# Altium PCB main_ADC_PCB.PcbDoc (part 2 of 8)
Units mm, origin at the board's own origin, x right, y up, seen from the top; angles counter-clockwise.
Board outline 150 x 100 mm, 4 copper layers (Top Layer, Layer 1, Layer 2, Bottom Layer), stack 1.62 mm thick; 535 components, 354 nets, 1725 pads, 1075 vias.
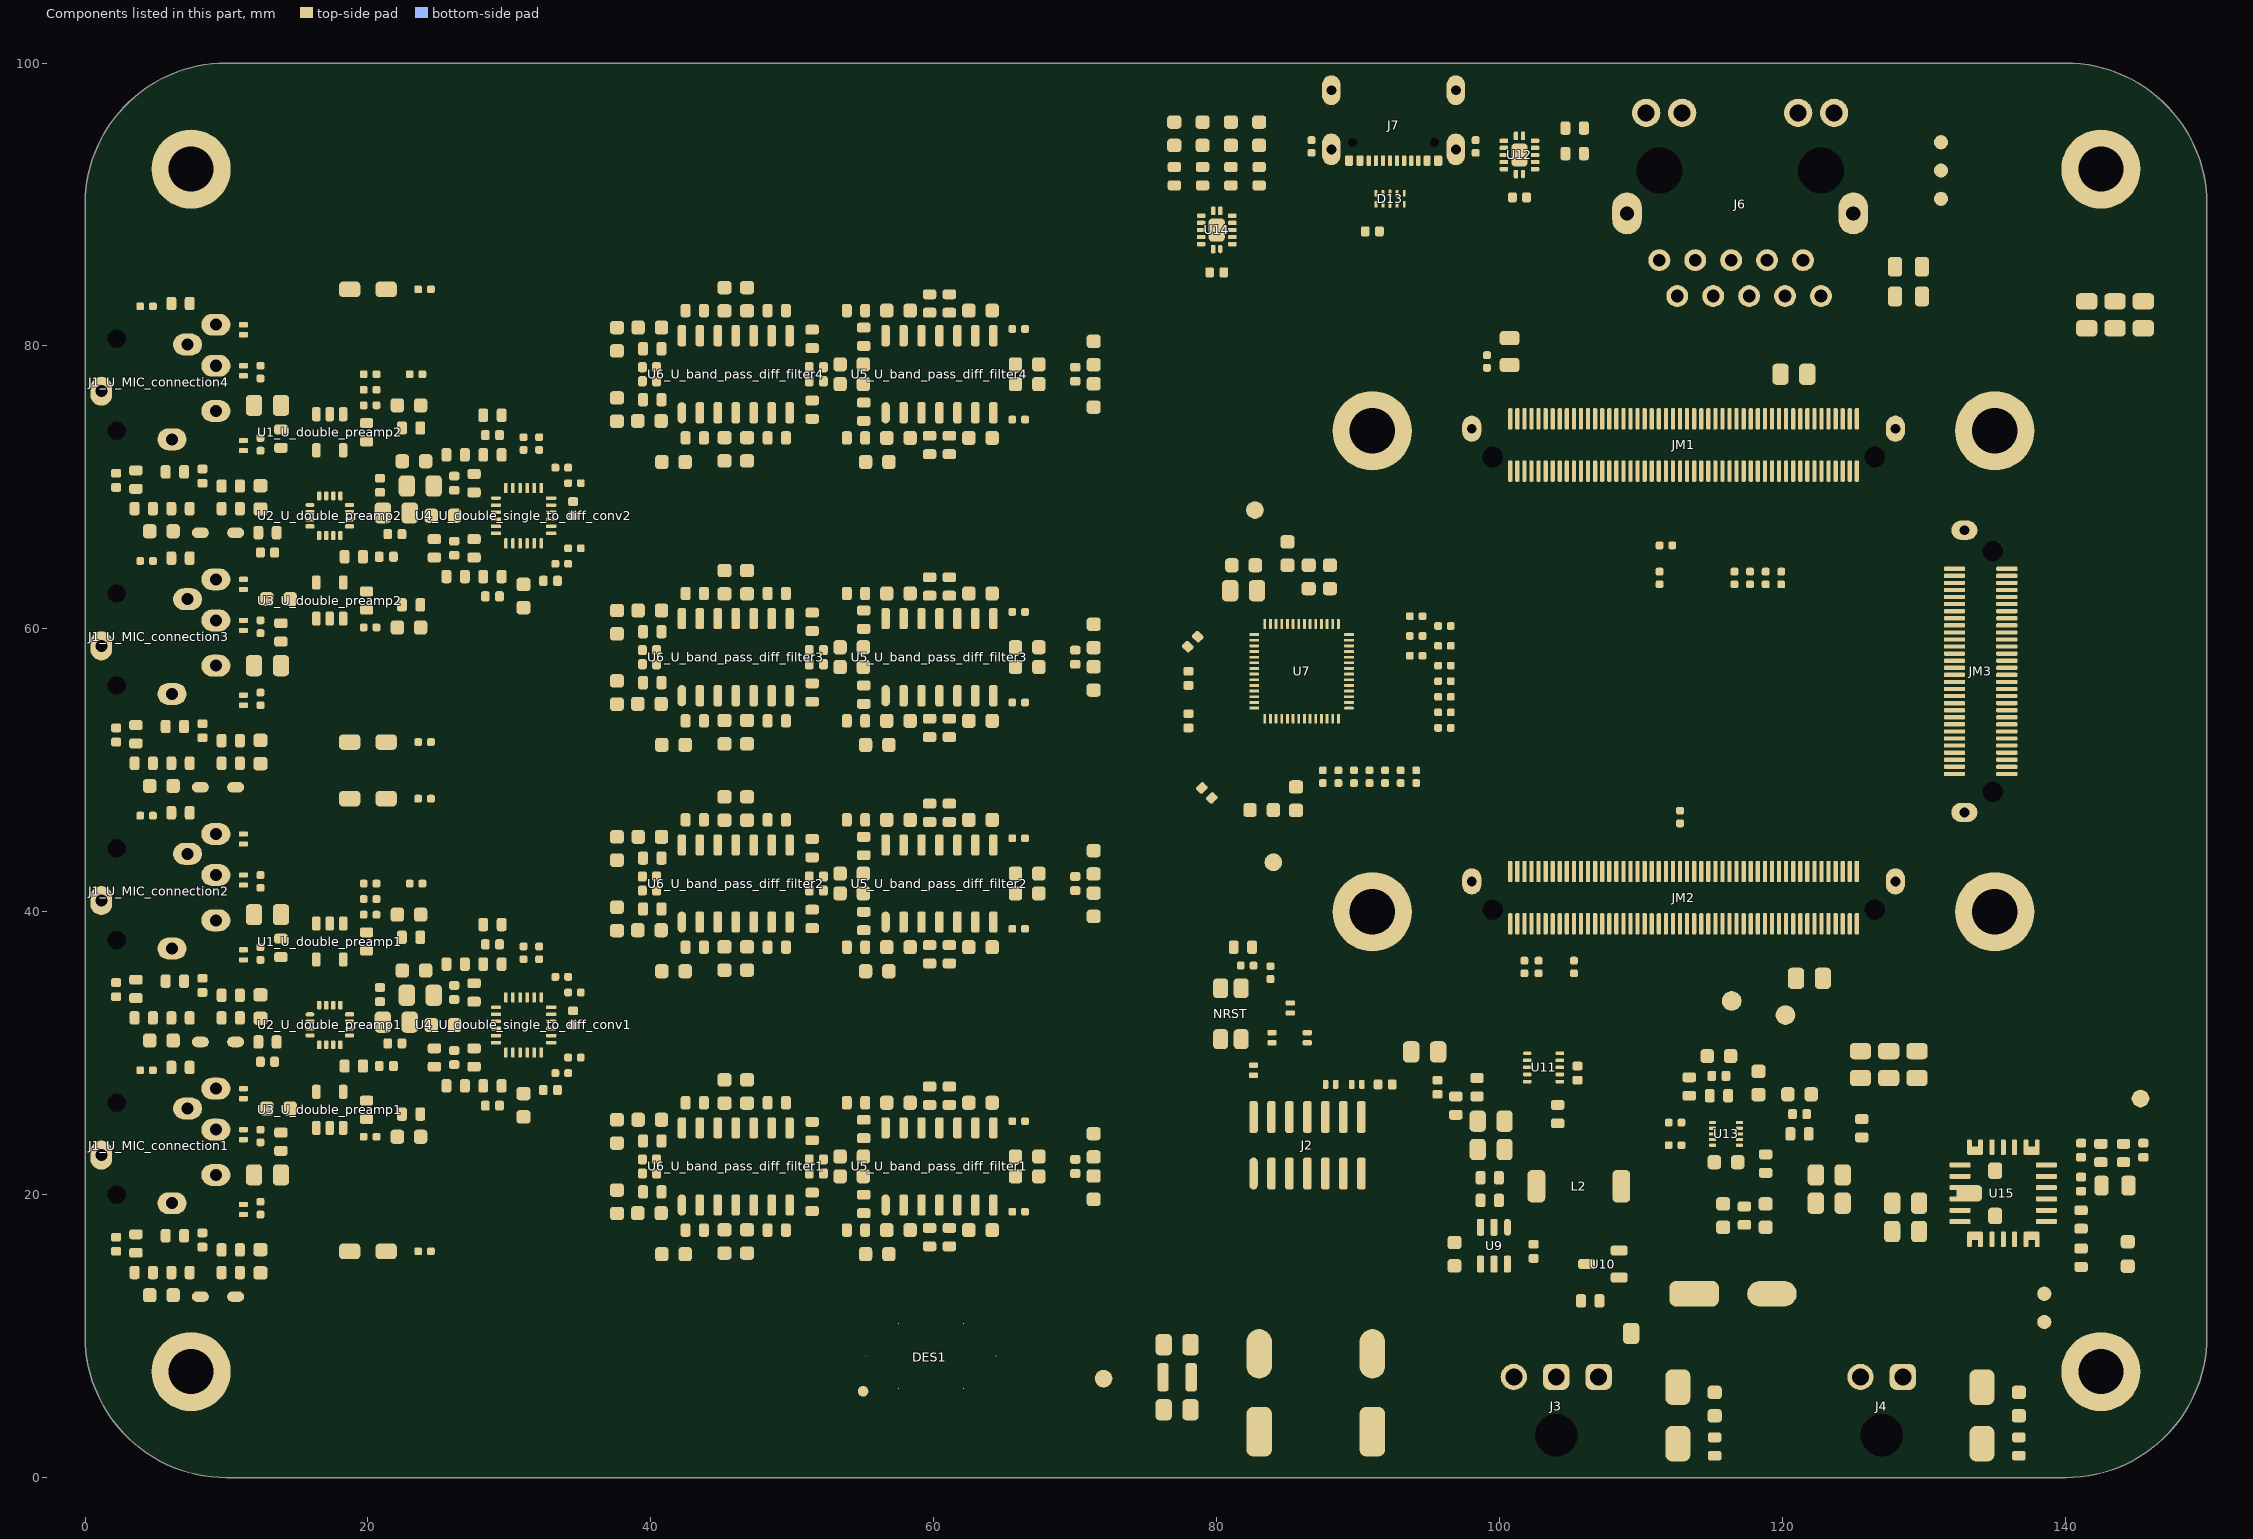
[diagram p4: the components of this part, seen from the top]

## Components (designator, comment, footprint, x,y, rotation, side; value= is the part's Value field where it differs from the comment) (continued)
R3_U_MIC_connection3 "AC0603FR-7W2K2L" RESC_0603 6.75,50.5 r0 top value=2.2kR (schematic designator R3)
R3_U_MIC_connection4 "AC0603FR-7W2K2L" RESC_0603 6.75,68.5 r0 top value=2.2kR (schematic designator R3)
R4_U_MIC_connection1 "AC0603FR-7W2K2L" RESC_0603 4.15,14.5 r0 top value=2.2kR (schematic designator R4)
R4_U_MIC_connection2 "AC0603FR-7W2K2L" RESC_0603 4.15,32.5 r0 top value=2.2kR (schematic designator R4)
R4_U_MIC_connection3 "AC0603FR-7W2K2L" RESC_0603 4.15,50.5 r0 top value=2.2kR (schematic designator R4)
R4_U_MIC_connection4 "AC0603FR-7W2K2L" RESC_0603 4.15,68.5 r0 top value=2.2kR (schematic designator R4)
R5_U_MIC_connection1 "RC0603FR-7W3KL" RESC_0603 6.35,17.1 r0 top value=3kR (schematic designator R5)
R5_U_MIC_connection2 "RC0603FR-7W3KL" RESC_0603 6.35,35.1 r0 top value=3kR (schematic designator R5)
R5_U_MIC_connection3 "RC0603FR-7W3KL" RESC_0603 6.35,53.1 r0 top value=3kR (schematic designator R5)
R5_U_MIC_connection4 "RC0603FR-7W3KL" RESC_0603 6.35,71.1 r0 top value=3kR (schematic designator R5)
R6_U_MIC_connection1 "RC0402JR-7D1KL" RESC_0402 4.35,28.8 r180 top value=1kR (schematic designator R6)
R6_U_MIC_connection2 "RC0402JR-7D1KL" RESC_0402 4.35,46.8 r180 top value=1kR (schematic designator R6)
R6_U_MIC_connection3 "RC0402JR-7D1KL" RESC_0402 4.35,64.8 r180 top value=1kR (schematic designator R6)
R6_U_MIC_connection4 "RC0402JR-7D1KL" RESC_0402 4.35,82.8 r180 top value=1kR (schematic designator R6)
R7_U_double_preamp1 "RG1005R-330-D-T10" RESC_0402 20.15,39.8 r180 top value=33R (schematic designator R7)
R7_U_double_preamp2 "RG1005R-330-D-T10" RESC_0402 20.15,75.8 r180 top value=33R (schematic designator R7)
R8 "AC0402DR-0710KL" RESC_0402 111.3,63.6 r270 top value=10kR
R11_U_double_preamp1 "ERA-3AEB4752V" RESC_0603 19.9,37.9 r270 top value=47.5kR (schematic designator R11)
R11_U_double_preamp2 "ERA-3AEB4752V" RESC_0603 19.9,73.9 r270 top value=47.5kR (schematic designator R11)
R12_U_double_preamp1 "ERA-3AEB273V" RESC_0603 13.848,37.45 r270 top value=27kR (schematic designator R12)
R12_U_double_preamp2 "ERA-3AEB273V" RESC_0603 13.848,73.45 r270 top value=27kR (schematic designator R12)
R13_U_double_preamp1 "ERA-3AEB273V" RESC_0603 23.05,38.2 r180 top value=27kR (schematic designator R13)
R13_U_double_preamp2 "ERA-3AEB273V" RESC_0603 23.05,74.2 r180 top value=27kR (schematic designator R13)
R14_U_double_preamp1 "RT0603BRE07220RL" RESC_0603 12.9,30.8 r180 top value=220R (schematic designator R14)
R14_U_double_preamp2 "RT0603BRE07220RL" RESC_0603 12.9,66.8 r180 top value=220R (schematic designator R14)
R15_U_double_preamp1 "AC0402DR-0710KL" RESC_0402 20.15,40.9 r0 top value=10kR (schematic designator R15)
R15_U_double_preamp2 "AC0402DR-0710KL" RESC_0402 20.15,76.9 r0 top value=10kR (schematic designator R15)
R16_U_double_preamp1 "RT0603BRE07220RL" RESC_0603 19,29.1 r0 top value=220R (schematic designator R16)
R16_U_double_preamp2 "RT0603BRE07220RL" RESC_0603 19,65.1 r0 top value=220R (schematic designator R16)
R17_U_double_preamp1 "ERA-3AEB273V" RESC_0603 13.848,23.75 r270 top value=27kR (schematic designator R17)
R17_U_double_preamp2 "ERA-3AEB273V" RESC_0603 13.848,59.75 r270 top value=27kR (schematic designator R17)
R18_U_double_preamp1 "RG1005R-330-D-T10" RESC_0402 20.15,24.1 r180 top value=33R (schematic designator R18)
R18_U_double_preamp2 "RG1005R-330-D-T10" RESC_0402 20.15,60.1 r180 top value=33R (schematic designator R18)
R19_U_double_preamp1 "ERA-3AEB273V" RESC_0603 23.05,25.7 r180 top value=27kR (schematic designator R19)
R19_U_double_preamp2 "ERA-3AEB273V" RESC_0603 23.05,61.7 r180 top value=27kR (schematic designator R19)
R20_U_double_single_to_diff_conv1 "AC0402DR-0710KL" RESC_0402 31,37.1 r270 top value=10kR (schematic designator R20)
R20_U_double_single_to_diff_conv2 "AC0402DR-0710KL" RESC_0402 31,73.1 r270 top value=10kR (schematic designator R20)
R21_U_double_single_to_diff_conv1 "ERA-3AEB4752V" RESC_0603 28.8,36.3 r180 top value=47.5kR (schematic designator R21)
R21_U_double_single_to_diff_conv2 "ERA-3AEB4752V" RESC_0603 28.8,72.3 r180 top value=47.5kR (schematic designator R21)
R22_U_double_single_to_diff_conv1 "TNPW060317K6BEEA" RESC_0603 28.8,39.1 r0 top value=17.6kR (schematic designator R22)
R22_U_double_single_to_diff_conv2 "TNPW060317K6BEEA" RESC_0603 28.8,75.1 r0 top value=17.6kR (schematic designator R22)
R23_U_double_single_to_diff_conv1 "RG1005R-330-D-T10" RESC_0402 33.7,35.4 r180 top value=33R (schematic designator R23)
R23_U_double_single_to_diff_conv2 "RG1005R-330-D-T10" RESC_0402 33.7,71.4 r180 top value=33R (schematic designator R23)
R24_U_double_single_to_diff_conv1 "RP0603BRD071KL" RESC_0603 26.2,36.3 r180 top value=1kR (schematic designator R24)
R24_U_double_single_to_diff_conv2 "RP0603BRD071KL" RESC_0603 26.2,72.3 r180 top value=1kR (schematic designator R24)
R25_U_double_single_to_diff_conv1 "ERA-3AEB4752V" RESC_0603 27.5,34.3 r90 top value=47.5kR (schematic designator R25)
R25_U_double_single_to_diff_conv2 "ERA-3AEB4752V" RESC_0603 27.5,70.3 r90 top value=47.5kR (schematic designator R25)
R26_U_double_single_to_diff_conv1 "RG1005R-330-D-T10" RESC_0402 34.6,34.3 r180 top value=33R (schematic designator R26)
R26_U_double_single_to_diff_conv2 "RG1005R-330-D-T10" RESC_0402 34.6,70.3 r180 top value=33R (schematic designator R26)
R27_U_double_single_to_diff_conv1 "ERA-3AEB4752V" RESC_0603 27.5,29.7 r270 top value=47.5kR (schematic designator R27)
R27_U_double_single_to_diff_conv2 "ERA-3AEB4752V" RESC_0603 27.5,65.7 r270 top value=47.5kR (schematic designator R27)
R28_U_double_single_to_diff_conv1 "RG1005R-330-D-T10" RESC_0402 34.6,29.7 r180 top value=33R (schematic designator R28)
R28_U_double_single_to_diff_conv2 "RG1005R-330-D-T10" RESC_0402 34.6,65.7 r180 top value=33R (schematic designator R28)
R29_U_double_single_to_diff_conv1 "TNPW060317K6BEEA" RESC_0603 24.7,29.7 r90 top value=17.6kR (schematic designator R29)
R29_U_double_single_to_diff_conv2 "TNPW060317K6BEEA" RESC_0603 24.7,65.7 r90 top value=17.6kR (schematic designator R29)
R30_U_double_single_to_diff_conv1 "RG1005R-330-D-T10" RESC_0402 33.7,28.6 r180 top value=33R (schematic designator R30)
R30_U_double_single_to_diff_conv2 "RG1005R-330-D-T10" RESC_0402 33.7,64.6 r180 top value=33R (schematic designator R30)
R31_U_double_single_to_diff_conv1 "RP0603BRD071KL" RESC_0603 26.2,27.7 r180 top value=1kR (schematic designator R31)
R31_U_double_single_to_diff_conv2 "RP0603BRD071KL" RESC_0603 26.2,63.7 r180 top value=1kR (schematic designator R31)
R32_U_double_single_to_diff_conv1 "ERA-3AEB4752V" RESC_0603 28.8,27.7 r180 top value=47.5kR (schematic designator R32)
R32_U_double_single_to_diff_conv2 "ERA-3AEB4752V" RESC_0603 28.8,63.7 r180 top value=47.5kR (schematic designator R32)
R33_U_double_single_to_diff_conv1 "AC0402DR-0710KL" RESC_0402 32.1,37.1 r90 top value=10kR (schematic designator R33)
R33_U_double_single_to_diff_conv2 "AC0402DR-0710KL" RESC_0402 32.1,73.1 r90 top value=10kR (schematic designator R33)
R34_U_band_pass_diff_filter1 "RT0603BRD0731K6L" RESC_0603 48.9,17.5 r180 top value=31.6kR (schematic designator R34)
R34_U_band_pass_diff_filter2 "RT0603BRD0731K6L" RESC_0603 48.9,37.5 r180 top value=31.6kR (schematic designator R34)
R34_U_band_pass_diff_filter3 "RT0603BRD0731K6L" RESC_0603 48.9,53.5 r180 top value=31.6kR (schematic designator R34)
R34_U_band_pass_diff_filter4 "RT0603BRD0731K6L" RESC_0603 48.9,73.5 r180 top value=31.6kR (schematic designator R34)
R35_U_band_pass_diff_filter1 "RP0603BRD073K65L" RESC_0603 43.1,17.5 r180 top value=44.2kR (schematic designator R35)
R35_U_band_pass_diff_filter2 "RP0603BRD073K65L" RESC_0603 43.1,37.5 r180 top value=44.2kR (schematic designator R35)
R35_U_band_pass_diff_filter3 "RP0603BRD073K65L" RESC_0603 43.1,53.5 r180 top value=44.2kR (schematic designator R35)
R35_U_band_pass_diff_filter4 "RP0603BRD073K65L" RESC_0603 43.1,73.5 r180 top value=44.2kR (schematic designator R35)
R36_U_band_pass_diff_filter1 "ERA-3AEB2492V" RESC_0603 59.7,17 r90 top value=24.9kR (schematic designator R36)
R36_U_band_pass_diff_filter2 "ERA-3AEB2492V" RESC_0603 59.7,37 r90 top value=24.9kR (schematic designator R36)
R36_U_band_pass_diff_filter3 "ERA-3AEB2492V" RESC_0603 59.7,53 r90 top value=24.9kR (schematic designator R36)
R36_U_band_pass_diff_filter4 "ERA-3AEB2492V" RESC_0603 59.7,73 r90 top value=24.9kR (schematic designator R36)
R37_U_band_pass_diff_filter1 "RG1608P-4992-B-T5" RESC_0603 61.1,17 r270 top value=49.9kR (schematic designator R37)
R37_U_band_pass_diff_filter2 "RG1608P-4992-B-T5" RESC_0603 61.1,37 r270 top value=49.9kR (schematic designator R37)
R37_U_band_pass_diff_filter3 "RG1608P-4992-B-T5" RESC_0603 61.1,53 r270 top value=49.9kR (schematic designator R37)
R37_U_band_pass_diff_filter4 "RG1608P-4992-B-T5" RESC_0603 61.1,73 r270 top value=49.9kR (schematic designator R37)
R38_U_band_pass_diff_filter1 "RT0603BRD0710KL" RESC_0603 54.5,17.5 r180 top value=10kR (schematic designator R38)
R38_U_band_pass_diff_filter2 "RT0603BRD0710KL" RESC_0603 54.5,37.5 r180 top value=10kR (schematic designator R38)
R38_U_band_pass_diff_filter3 "RT0603BRD0710KL" RESC_0603 54.5,53.5 r180 top value=10kR (schematic designator R38)
R38_U_band_pass_diff_filter4 "RT0603BRD0710KL" RESC_0603 54.5,73.5 r180 top value=10kR (schematic designator R38)
R39_U_band_pass_diff_filter1 "RT0603BRD0722K1L" RESC_0603 55.05,19.35 r270 top value=22.1kR (schematic designator R39)
R39_U_band_pass_diff_filter2 "RT0603BRD0722K1L" RESC_0603 55.05,39.35 r270 top value=22.1kR (schematic designator R39)
R39_U_band_pass_diff_filter3 "RT0603BRD0722K1L" RESC_0603 55.05,55.35 r270 top value=22.1kR (schematic designator R39)
R39_U_band_pass_diff_filter4 "RT0603BRD0722K1L" RESC_0603 55.05,75.35 r270 top value=22.1kR (schematic designator R39)
R40_U_band_pass_diff_filter1 "RG1005R-330-D-T10" RESC_0402 66,18.8 r0 top value=33R (schematic designator R40)
R40_U_band_pass_diff_filter2 "RG1005R-330-D-T10" RESC_0402 66,38.8 r0 top value=33R (schematic designator R40)
R40_U_band_pass_diff_filter3 "RG1005R-330-D-T10" RESC_0402 66,54.8 r0 top value=33R (schematic designator R40)
R40_U_band_pass_diff_filter4 "RG1005R-330-D-T10" RESC_0402 66,74.8 r0 top value=33R (schematic designator R40)
R41_U_band_pass_diff_filter1 "RT0603BRD0782KL" RESC_0603 51.4,19.5 r270 top value=82kR (schematic designator R41)
R41_U_band_pass_diff_filter2 "RT0603BRD0782KL" RESC_0603 51.4,39.5 r270 top value=82kR (schematic designator R41)
R41_U_band_pass_diff_filter3 "RT0603BRD0782KL" RESC_0603 51.4,55.5 r270 top value=82kR (schematic designator R41)
R41_U_band_pass_diff_filter4 "RT0603BRD0782KL" RESC_0603 51.4,75.5 r270 top value=82kR (schematic designator R41)
R42_U_band_pass_diff_filter1 "ERA-3AEB4752V" RESC_0603 40.1,20.2 r180 top value=47.5kR (schematic designator R42)
R42_U_band_pass_diff_filter2 "ERA-3AEB4752V" RESC_0603 40.1,40.2 r180 top value=47.5kR (schematic designator R42)
R42_U_band_pass_diff_filter3 "ERA-3AEB4752V" RESC_0603 40.1,56.2 r180 top value=47.5kR (schematic designator R42)
R42_U_band_pass_diff_filter4 "ERA-3AEB4752V" RESC_0603 40.1,76.2 r180 top value=47.5kR (schematic designator R42)
R43_U_band_pass_diff_filter1 "RT0603BRD0731K6L" RESC_0603 48.9,26.5 r180 top value=31.6kR (schematic designator R43)
R43_U_band_pass_diff_filter2 "RT0603BRD0731K6L" RESC_0603 48.9,46.5 r180 top value=31.6kR (schematic designator R43)
R43_U_band_pass_diff_filter3 "RT0603BRD0731K6L" RESC_0603 48.9,62.5 r180 top value=31.6kR (schematic designator R43)
R43_U_band_pass_diff_filter4 "RT0603BRD0731K6L" RESC_0603 48.9,82.5 r180 top value=31.6kR (schematic designator R43)
R44_U_band_pass_diff_filter1 "RP0603BRD073K65L" RESC_0603 43.1,26.5 r180 top value=44.2kR (schematic designator R44)
R44_U_band_pass_diff_filter2 "RP0603BRD073K65L" RESC_0603 43.1,46.5 r180 top value=44.2kR (schematic designator R44)
R44_U_band_pass_diff_filter3 "RP0603BRD073K65L" RESC_0603 43.1,62.5 r180 top value=44.2kR (schematic designator R44)
R44_U_band_pass_diff_filter4 "RP0603BRD073K65L" RESC_0603 43.1,82.5 r180 top value=44.2kR (schematic designator R44)
R45_U_band_pass_diff_filter1 "ERA-3AEB2492V" RESC_0603 59.7,27 r270 top value=24.9kR (schematic designator R45)
R45_U_band_pass_diff_filter2 "ERA-3AEB2492V" RESC_0603 59.7,47 r270 top value=24.9kR (schematic designator R45)
R45_U_band_pass_diff_filter3 "ERA-3AEB2492V" RESC_0603 59.7,63 r270 top value=24.9kR (schematic designator R45)
R45_U_band_pass_diff_filter4 "ERA-3AEB2492V" RESC_0603 59.7,83 r270 top value=24.9kR (schematic designator R45)
R46_U_band_pass_diff_filter1 "RG1608P-4992-B-T5" RESC_0603 61.1,27 r90 top value=49.9kR (schematic designator R46)
R46_U_band_pass_diff_filter2 "RG1608P-4992-B-T5" RESC_0603 61.1,47 r90 top value=49.9kR (schematic designator R46)
R46_U_band_pass_diff_filter3 "RG1608P-4992-B-T5" RESC_0603 61.1,63 r90 top value=49.9kR (schematic designator R46)
R46_U_band_pass_diff_filter4 "RG1608P-4992-B-T5" RESC_0603 61.1,83 r90 top value=49.9kR (schematic designator R46)
R47_U_band_pass_diff_filter1 "RT0603BRD0710KL" RESC_0603 54.5,26.5 r180 top value=10kR (schematic designator R47)
R47_U_band_pass_diff_filter2 "RT0603BRD0710KL" RESC_0603 54.5,46.5 r180 top value=10kR (schematic designator R47)
R47_U_band_pass_diff_filter3 "RT0603BRD0710KL" RESC_0603 54.5,62.5 r180 top value=10kR (schematic designator R47)
R47_U_band_pass_diff_filter4 "RT0603BRD0710KL" RESC_0603 54.5,82.5 r180 top value=10kR (schematic designator R47)
R48_U_band_pass_diff_filter1 "RT0603BRD0722K1L" RESC_0603 55.05,24.65 r90 top value=22.1kR (schematic designator R48)
R48_U_band_pass_diff_filter2 "RT0603BRD0722K1L" RESC_0603 55.05,44.65 r90 top value=22.1kR (schematic designator R48)
R48_U_band_pass_diff_filter3 "RT0603BRD0722K1L" RESC_0603 55.05,60.65 r90 top value=22.1kR (schematic designator R48)
R48_U_band_pass_diff_filter4 "RT0603BRD0722K1L" RESC_0603 55.05,80.65 r90 top value=22.1kR (schematic designator R48)
R49_U_band_pass_diff_filter1 "RG1005R-330-D-T10" RESC_0402 66,25.2 r0 top value=33R (schematic designator R49)
R49_U_band_pass_diff_filter2 "RG1005R-330-D-T10" RESC_0402 66,45.2 r0 top value=33R (schematic designator R49)
R49_U_band_pass_diff_filter3 "RG1005R-330-D-T10" RESC_0402 66,61.2 r0 top value=33R (schematic designator R49)
R49_U_band_pass_diff_filter4 "RG1005R-330-D-T10" RESC_0402 66,81.2 r0 top value=33R (schematic designator R49)
R50_U_band_pass_diff_filter1 "RT0603BRD0782KL" RESC_0603 51.4,24.5 r90 top value=82kR (schematic designator R50)
R50_U_band_pass_diff_filter2 "RT0603BRD0782KL" RESC_0603 51.4,44.5 r90 top value=82kR (schematic designator R50)
R50_U_band_pass_diff_filter3 "RT0603BRD0782KL" RESC_0603 51.4,60.5 r90 top value=82kR (schematic designator R50)
R50_U_band_pass_diff_filter4 "RT0603BRD0782KL" RESC_0603 51.4,80.5 r90 top value=82kR (schematic designator R50)
R51_U_band_pass_diff_filter1 "ERA-3AEB4752V" RESC_0603 40.1,23.8 r180 top value=47.5kR (schematic designator R51)
R51_U_band_pass_diff_filter2 "ERA-3AEB4752V" RESC_0603 40.1,43.8 r180 top value=47.5kR (schematic designator R51)
R51_U_band_pass_diff_filter3 "ERA-3AEB4752V" RESC_0603 40.1,59.8 r180 top value=47.5kR (schematic designator R51)
R51_U_band_pass_diff_filter4 "ERA-3AEB4752V" RESC_0603 40.1,79.8 r180 top value=47.5kR (schematic designator R51)
R52_U_MIC_connection1 "AC0603FR-7W2K2L" RESC_0603 10.3,14.5 r0 top value=2.2kR (schematic designator R52)
R52_U_MIC_connection2 "AC0603FR-7W2K2L" RESC_0603 10.3,32.5 r0 top value=2.2kR (schematic designator R52)
R52_U_MIC_connection3 "AC0603FR-7W2K2L" RESC_0603 10.3,50.5 r0 top value=2.2kR (schematic designator R52)
R52_U_MIC_connection4 "AC0603FR-7W2K2L" RESC_0603 10.3,68.5 r0 top value=2.2kR (schematic designator R52)
R53_U_MIC_connection1 "AC0603FR-7W2K2L" RESC_0603 10.3,16.1 r180 top value=2.2kR (schematic designator R53)
R53_U_MIC_connection2 "AC0603FR-7W2K2L" RESC_0603 10.3,34.1 r180 top value=2.2kR (schematic designator R53)
R53_U_MIC_connection3 "AC0603FR-7W2K2L" RESC_0603 10.3,52.1 r180 top value=2.2kR (schematic designator R53)
R53_U_MIC_connection4 "AC0603FR-7W2K2L" RESC_0603 10.3,70.1 r180 top value=2.2kR (schematic designator R53)
R54_U_MIC_connection1 "RC0603FR-7W3KL" RESC_0603 3.6,16.55 r270 top value=3kR (schematic designator R54)
R54_U_MIC_connection2 "RC0603FR-7W3KL" RESC_0603 3.6,34.55 r270 top value=3kR (schematic designator R54)
R54_U_MIC_connection3 "RC0603FR-7W3KL" RESC_0603 3.6,52.55 r270 top value=3kR (schematic designator R54)
R54_U_MIC_connection4 "RC0603FR-7W3KL" RESC_0603 3.6,70.55 r270 top value=3kR (schematic designator R54)
R55 "RG1005R-330-D-T10" RESC_0402 112.75,46.7 r90 top value=33R
R56 "RG1005R-330-D-T10" RESC_0402 91.9,49.55 r90 top value=33R
R57 "RG1005R-330-D-T10" RESC_0402 94.1,60.9 r180 top value=33R
R58 "RG1005R-330-D-T10" RESC_0402 93,49.55 r90 top value=33R
R59 "RG1005R-330-D-T10" RESC_0402 96.1,60.2 r180 top value=33R
R60 "RG1005R-330-D-T10" RESC_0402 96.1,57.4 r180 top value=33R
R61 "RG1005R-330-D-T10" RESC_0402 96.1,53 r180 top value=33R
R62 "RG1005R-330-D-T10" RESC_0402 94.1,58.1 r180 top value=33R
R63 "RG1005R-330-D-T10" RESC_0402 96.1,54.1 r180 top value=33R
R64 "RG1005R-330-D-T10" RESC_0402 96.1,58.8 r180 top value=33R
R65 "RG1005R-330-D-T10" RESC_0402 96.1,55.2 r180 top value=33R
R66 "RG1005R-330-D-T10" RESC_0402 94.1,59.5 r180 top value=33R
R67 "RG1005R-330-D-T10" RESC_0402 96.1,56.3 r180 top value=33R
R68 "RG1005R-330-D-T10" RESC_0402 101.75,36.1 r270 top value=33R
R69 "AC0402DR-0710KL" RESC_0402 89.7,49.55 r270 top value=10kR
R70 "RG1005R-330-D-T10" RESC_0402 87.5,49.55 r90 top value=33R
R71 "RG1005R-330-D-T10" RESC_0402 105.25,36.1 r270 top value=33R
R72 "RG1005R-330-D-T10" RESC_0402 88.6,49.55 r90 top value=33R
R73 "RG1005R-330-D-T10" RESC_0402 90.8,49.55 r90 top value=33R
R74 "RG1005R-330-D-T10" RESC_0402 94.1,49.55 r90 top value=33R
R75 "RG1005R-330-D-T10" RESC_0402 102.75,36.1 r270 top value=33R
R76 "AC0603DR-07100KL" RESC_0603 6.75,83 r0 top value=100kR
R77 "RG1005R-330-D-T10" RESC_0402 24,84 r180 top value=33R
R78 "AC0603DR-07100KL" RESC_0603 6.75,65 r0 top value=100kR
R79 "RG1005R-330-D-T10" RESC_0402 24,52 r180 top value=33R
R80_U_double_preamp1 "RG1005R-330-D-T10" RESC_0402 20.15,42 r180 top value=33R (schematic designator R80)
R80_U_double_preamp2 "RG1005R-330-D-T10" RESC_0402 20.15,78 r180 top value=33R (schematic designator R80)
R81 "RT0603DRD0715KL" RESC_0603 99.3,19.6 r0 top value=15kR
R82 "RT0603BRD0782KL" RESC_0603 99.3,21.2 r180 top value=82kR
R83 "AC0603DR-07100KL" RESC_0603 106.4,12.5 r0 top value=100kR
R84 "RT0603BRD0710K5L" RESC_0603 98.4,27.6 r270 top value=10.5kR
R85 "RT0603BRD072KL" RESC_0603 96.9,26.3 r270 top value=2kR
R86 "RC0805JR-070RP" RESC_0805 128.9,85.6 r0 top value=0R
R87 "AC0603FR-7W220RL" RESC_0603 105.3,93.6 r180 top value=220R
R88 "AC0603FR-7W220RL" RESC_0603 105.3,95.4 r180 top value=220R
R89 "AC0402FR-075K1L" RESC_0402 98.3,94.1 r270 top value=5.1kR
R90 "AC0402FR-075K1L" RESC_0402 86.7,94.1 r270 top value=5.1kR
R91 "RC0603FR-07560RL" RESC_0603 136.7,2.2 r270 top value=560R
R92 "RT0603DRD0775KL" RESC_0603 115.5,27 r0 top value=75kR
R93 "RT0603DRD0715KL" RESC_0603 113.4,27.65 r90 top value=15kR
R94 "RT0603DRE0734KL" RESC_0603 121.2,24.3 r0 top value=34kR
R95 "RT0603DRD0715KL" RESC_0603 118.8,22.2 r90 top value=15kR
R96 "AC0402DR-0710KL" RESC_0402 112.4,23.5 r180 top value=10kR
R97 "AC0402DR-0710KL" RESC_0402 112.4,25.1 r180 top value=10kR
R98 "AC0603FR-7W220RL" RESC_0603 83,92 r270 top value=220R
R99 "AC0603FR-7W220RL" RESC_0603 81,92 r270 top value=220R
R100 "AC0603FR-7W220RL" RESC_0603 79,92 r270 top value=220R
R101 "AC0603FR-7W220RL" RESC_0603 77,92 r270 top value=220R
R102 "RC0402JR-7D1KL" RESC_0402 118.8,63.6 r90 top value=1kR
R103 "RC0402JR-7D1KL" RESC_0402 117.7,63.6 r90 top value=1kR
R104 "RC0402JR-7D1KL" RESC_0402 119.9,63.6 r90 top value=1kR
R105 "RC0402JR-7D1KL" RESC_0402 116.6,63.6 r90 top value=1kR
R106 "RC0402JR-7D1KL" RESC_0402 99.1,78.9 r270 top value=1kR
R107 "RC0805JR-070RP" RESC_0805 100.7,79.6 r270 top value=0R
R108 "RC0402JR-7D1KL" RESC_0402 82.15,36.2 r180 top value=1kR
R109 "AC0603DR-07100KL" RESC_0603 81.85,37.5 r180 top value=100kR
R110 "RG1005R-330-D-T10" RESC_0402 83.8,35.7 r270 top value=33R
R111 "AC0603FR-07255KL" RESC_0603 125.6,24.7 r90 top value=255kR
R112 "RT0603BRD072KL" RESC_0603 144.1,22.95 r270 top value=2kR
R113 "RT0603BRD07442RL" RESC_0603 142.5,22.95 r90 top value=442R
R114 "AC0603DR-07100KL" RESC_0603 141.1,15.55 r90 top value=100kR
R115 "AC0603FR-0778K7L" RESC_0603 141.1,18.25 r270 top value=78.7kR
R116 "RC0805JR-070RP" RESC_0805 143.5,20.65 r0 top value=0R
R117 "AC0603DR-07100KL" RESC_0603 6.75,47 r0 top value=100kR
R118 "RG1005R-330-D-T10" RESC_0402 24,48 r180 top value=33R
R119 "AC0603DR-07100KL" RESC_0603 6.75,29 r0 top value=100kR
R120 "RG1005R-330-D-T10" RESC_0402 24,16 r180 top value=33R
R121_U_double_preamp1 "ERA-3AEB4752V" RESC_0603 19.9,26 r270 top value=47.5kR (schematic designator R121)
R121_U_double_preamp2 "ERA-3AEB4752V" RESC_0603 19.9,62 r270 top value=47.5kR (schematic designator R121)
R122 "RP0603BRD071KL" RESC_0603 115.2,2.2 r270 top value=1kR
R123 "RC0805JR-070RP" RESC_0805 128.9,83.5 r0 top value=0R
R124 "AC0402DR-0710KL" RESC_0402 23.4,78 r0 top value=10kR
R125 "AC0402DR-0710KL" RESC_0402 23.4,42 r0 top value=10kR
R126 "RG1005R-330-D-T10" RESC_0402 111.75,65.9 r0 top value=33R
TP_1.8VD "Test Pad" TP_1.4mm#1 157.8,7.1 r90 top
TP_3.3PWR "Test Pad" TP_1.4mm#2 145.3,26.8 r90 top
TP_3.3VD "Test Pad" TP_1.4mm#3 165,11.8 r90 top
TP_5VA "Test Pad" TP_1.4mm#4 158.1,12.8 r90 top
TP_12VA "Test Pad" TP_1.4mm#2 72,7 r90 top
TP_VOCM "Test Pad" TP_1.4mm#5 152,0.8 r90 top
U1_U_double_preamp1 "LMP7731MFE/NOPB" IC_SOT-23-5 17.3,37.9 r270 top (schematic designator U1)
U1_U_double_preamp2 "LMP7731MFE/NOPB" IC_SOT-23-5 17.3,73.9 r270 top (schematic designator U1)
U2_U_double_preamp1 "AD5122BCPZ10-RL7" IC_LFCSP-16#1 17.3,32 r0 top (schematic designator U2)
U2_U_double_preamp2 "AD5122BCPZ10-RL7" IC_LFCSP-16#2 17.3,68 r0 top (schematic designator U2)
U3_U_double_preamp1 "LMP7731MFE/NOPB" IC_SOT-23-5 17.3,26 r90 top (schematic designator U3)
U3_U_double_preamp2 "LMP7731MFE/NOPB" IC_SOT-23-5 17.3,62 r90 top (schematic designator U3)
U4_U_double_single_to_diff_conv1 "THS4552IRTWR" IC_QFN-24_UF_LIT 31,32 r0 top (schematic designator U4)
U4_U_double_single_to_diff_conv2 "THS4552IRTWR" IC_QFN-24_UF_LIT 31,68 r0 top (schematic designator U4)
U5_U_band_pass_diff_filter1 "MCP6489-E/SL" IC_SOIC14 60.4,22 r90 top (schematic designator U5)
U5_U_band_pass_diff_filter2 "MCP6489-E/SL" IC_SOIC14 60.4,42 r90 top (schematic designator U5)
U5_U_band_pass_diff_filter3 "MCP6489-E/SL" IC_SOIC14 60.4,58 r90 top (schematic designator U5)
U5_U_band_pass_diff_filter4 "MCP6489-E/SL" IC_SOIC14 60.4,78 r90 top (schematic designator U5)
U6_U_band_pass_diff_filter1 "MCP6489-E/SL" IC_SOIC14 46,22 r90 top locked (schematic designator U6)
U6_U_band_pass_diff_filter2 "MCP6489-E/SL" IC_SOIC14 46,42 r90 top locked (schematic designator U6)
U6_U_band_pass_diff_filter3 "MCP6489-E/SL" IC_SOIC14 46,58 r90 top (schematic designator U6)
U6_U_band_pass_diff_filter4 "MCP6489-E/SL" IC_SOIC14 46,78 r90 top locked (schematic designator U6)
U7 "ADS127L14IRSHT" IC_VQFN56 86,57 r180 top
U9 "DCP3601NMR" IC_SOT23-6 99.6,16.4 r270 top
U10 "2N7002NXAKR" IC_SOT-23-3 107.3,15.1 r180 top
U11 "TPS7A9001DSKT" IC_SON-10 103.1,29 r0 top
U12 "74LVC125ABQ,115" IC_DHVQFN-14 101.4,93.5 r180 top
U13 "TLV75201PDSQT" IC_WSON-10 116,24.3 r0 top
U14 "74LVC125ABQ,115" IC_DHVQFN-14 80,88.2 r180 top
U15 "MPM3683GQN-7" IC_MPM3683GQN-7 135.6,20.1 r270 top
VCC "Test Pad" TP_1mm 138.5,13 r0 top

## Footprints (in the part's own frame and the unit in brackets; to place one, negate y for a bottom-side part, rotate by r counter-clockwise, add the part's x,y. Pads: shape width x height; smd on the part's side, far side on the other; paste and mask are expansions set on the pad)
CAPC_0402 [mm] "Chip Capacitor, 2-Leads, Body 1,00x0,50mm, IPC Medium Density"
  rrect50% 0.62x0.72 smd: 1(-0.5,0) 2(0.5,0)
  silkscreen extent 0,-0.5 0,0.5, body extent -0.6,-0.35 0.6,0.35, height 0.7
CAPC_0603#1 [mm] "Chip Capacitor, 2-Leads, Body 1,60x0,80mm, IPC Medium Density"
  rrect50% 0.95x1 smd: 1(-0.825,0) 2(0.825,0)
  silkscreen extent 0,-0.6 0,0.6, body extent -0.95,-0.5 0.95,0.5, height 1
CAPC_0603#2 [mm] "Chip Capacitor, 2-Leads, Body 1,60x0,80mm, IPC Medium Density"
  rrect50% 0.95x1 smd: 1(-0.9,0) 2(0.825,0)
  silkscreen extent 0,-0.6 0,0.6, body extent -0.95,-0.5 0.95,0.5, height 1
CAPC_0805 [mm] "Chip Capacitor, 2-Leads, Body 2,00x1,25mm, IPC Medium Density"
  rrect50% 1.15x1.5 smd: 1(-0.95,0) 2(0.95,0)
  silkscreen extent 0,-0.8 0,0.8, body extent -1.17,-0.75 1.17,0.75, height 1.5
CAPE_6.3R_7.7H [mm]
  oval 3.5x1.8 smd: 1(-2.75,0)
  rrect50% 3.5x1.8 smd: 2(2.75,0)
  silkscreen extent -4.08,-3.5 3.77,3.5, body extent -3.95,-3.4 3.65,3.4, height 8.01
CONS_20021521-00014C1LF [mm]
  oval 0.6x2.25 smd: 1(-3.81,-2)
  rrect50% 0.6x2.25 smd: 2(-3.81,2) 3(-2.54,-2) 4(-2.54,2) 5(-1.27,-2) 6(-1.27,2) 7(0,-2) 8(0,2) 9(1.27,-2) 10(1.27,2) 11(2.54,-2) 12(2.54,2) 13(3.81,-2) 14(3.81,2)
  silkscreen extent -7.9,-3.4 7.9,3.4, body extent -7.59,-2.75 7.59,2.75, height 5.6
CONS_LSHM-130-04.0-L-DV-A-S-TR [mm]
  rrect50% 0.3x1.5 smd: 1(7.25,-1.85) 2(7.25,1.85) 3(6.75,-1.85) 4(6.75,1.85) 5(6.25,-1.85) 6(6.25,1.85) 7(5.75,-1.85) 8(5.75,1.85) 9(5.25,-1.85) 10(5.25,1.85) 11(4.75,-1.85) 12(4.75,1.85) 13(4.25,-1.85) 14(4.25,1.85) 15(3.75,-1.85) 16(3.75,1.85) 17(3.25,-1.85) 18(3.25,1.85) 19(2.75,-1.85) 20(2.75,1.85) 21(2.25,-1.85) 22(2.25,1.85) 23(1.75,-1.85) 24(1.75,1.85) 25(1.25,-1.85) 26(1.25,1.85) 27(0.75,-1.85) 28(0.75,1.85) 29(0.25,-1.85) 30(0.25,1.85) 31(-0.25,-1.85) 32(-0.25,1.85) 33(-0.75,-1.85) 34(-0.75,1.85) 35(-1.25,-1.85) 36(-1.25,1.85) 37(-1.75,-1.85) 38(-1.75,1.85) 39(-2.25,-1.85) 40(-2.25,1.85) 41(-2.75,-1.85) 42(-2.75,1.85) 43(-3.25,-1.85) 44(-3.25,1.85) 45(-3.75,-1.85) 46(-3.75,1.85) 47(-4.25,-1.85) 48(-4.25,1.85) 49(-4.75,-1.85) 50(-4.75,1.85) 51(-5.25,-1.85) 52(-5.25,1.85) 53(-5.75,-1.85) 54(-5.75,1.85) 55(-6.25,-1.85) 56(-6.25,1.85) 57(-6.75,-1.85) 58(-6.75,1.85) 59(-7.25,-1.85) 60(-7.25,1.85)
  oval 1.35x1.85 hole 0.7 slot 1.2 at 90 deg: S1(-9.975,1.15) S2(9.975,1.15)
  round 1.35 hole 1.45 unplated: ""(-8.5,-0.85) ""(8.5,-0.85)
  silkscreen extent -10.07,-3.13 10.07,2.51, body extent -10.4,-2.49 10.4,2.54, height 5.4
CONS_LSHM-150-04.0-L-DV-A-S-TR [mm]
  rrect50% 0.3x1.5 smd: 1(12.25,-1.85) 2(12.25,1.85) 3(11.75,-1.85) 4(11.75,1.85) 5(11.25,-1.85) 6(11.25,1.85) 7(10.75,-1.85) 8(10.75,1.85) 9(10.25,-1.85) 10(10.25,1.85) 11(9.75,-1.85) 12(9.75,1.85) 13(9.25,-1.85) 14(9.25,1.85) 15(8.75,-1.85) 16(8.75,1.85) 17(8.25,-1.85) 18(8.25,1.85) 19(7.75,-1.85) 20(7.75,1.85) 21(7.25,-1.85) 22(7.25,1.85) 23(6.75,-1.85) 24(6.75,1.85) 25(6.25,-1.85) 26(6.25,1.85) 27(5.75,-1.85) 28(5.75,1.85) 29(5.25,-1.85) 30(5.25,1.85) 31(4.75,-1.85) 32(4.75,1.85) 33(4.25,-1.85) 34(4.25,1.85) 35(3.75,-1.85) 36(3.75,1.85) 37(3.25,-1.85) 38(3.25,1.85) 39(2.75,-1.85) 40(2.75,1.85) 41(2.25,-1.85) 42(2.25,1.85) 43(1.75,-1.85) 44(1.75,1.85) 45(1.25,-1.85) 46(1.25,1.85) 47(0.75,-1.85) 48(0.75,1.85) 49(0.25,-1.85) 50(0.25,1.85) 51(-0.25,-1.85) 52(-0.25,1.85) 53(-0.75,-1.85) 54(-0.75,1.85) 55(-1.25,-1.85) 56(-1.25,1.85) 57(-1.75,-1.85) 58(-1.75,1.85) 59(-2.25,-1.85) 60(-2.25,1.85) 61(-2.75,-1.85) 62(-2.75,1.85) 63(-3.25,-1.85) 64(-3.25,1.85) 65(-3.75,-1.85) 66(-3.75,1.85) 67(-4.25,-1.85) 68(-4.25,1.85) 69(-4.75,-1.85) 70(-4.75,1.85) 71(-5.25,-1.85) 72(-5.25,1.85) 73(-5.75,-1.85) 74(-5.75,1.85) 75(-6.25,-1.85) 76(-6.25,1.85) 77(-6.75,-1.85) 78(-6.75,1.85) 79(-7.25,-1.85) 80(-7.25,1.85) 81(-7.75,-1.85) 82(-7.75,1.85) 83(-8.25,-1.85) 84(-8.25,1.85) 85(-8.75,-1.85) 86(-8.75,1.85) 87(-9.25,-1.85) 88(-9.25,1.85) 89(-9.75,-1.85) 90(-9.75,1.85) 91(-10.25,-1.85) 92(-10.25,1.85) 93(-10.75,-1.85) 94(-10.75,1.85) 95(-11.25,-1.85) 96(-11.25,1.85) 97(-11.75,-1.85) 98(-11.75,1.85) 99(-12.25,-1.85) 100(-12.25,1.85)
  oval 1.35x1.85 hole 0.7 slot 1.2 at 90 deg: S1(-14.975,1.15) S2(14.975,1.15)
  round 1.35 hole 1.45 unplated: ""(-13.5,-0.85) ""(13.5,-0.85)
  silkscreen extent -15.07,-3.1 15.07,2.51, body extent -15.4,-2.49 15.4,2.54, height 5.4
CONT_43650-0200 [mm]
  round 1.85 hole 1.2: 1(-3,0)
  rrect50% 1.85x1.85 hole 1.2: 2(0,0)
  rrect50% 1.5x1.5 hole 3 unplated: MH(-1.5,-4.125)
  silkscreen extent -6.5,-6.25 3.5,1.25, body extent -6.33,-8.75 3.32,1.15, height 5.54
CONT_43650-0300 [mm]
  round 1.85 hole 1.2: 1(-3,0)
  rrect50% 1.85x1.85 hole 1.2: 2(0,0) 3(3,0)
  rrect50% 1.5x1.5 hole 3 unplated: MH(0,-4.125)
  silkscreen extent -6.5,-6.25 6.5,1.25, body extent -6.32,-8.8 6.32,1.1, height 5.66
CONT_74991104403 [mm]
  round 1.55 hole 0.9: 1(-5.715,6.475) 2(-4.445,3.935) 3(-3.175,6.475) 4(-1.905,3.935) 5(-0.635,6.475) 6(0.635,3.935) 7(1.905,6.475) 8(3.175,3.935) 9(4.445,6.475) 10(5.715,3.935)
  round 2 hole 1.2: 11(-6.64,-6.475) 12(-4.1,-6.475) 13(4.1,-6.475) 14(6.64,-6.475)
  round 1.3 hole 3.25 unplated: MH1(-5.715,-2.415) MH2(5.715,-2.415)
  oval 2.1x2.95 hole 1 slot 1.75 at 90 deg: MT1(8,0.635) MT2(-8,0.635)
  silkscreen extent -8.3,-8 8.3,8.49, body extent -8.17,-13.08 8.17,8.27, height 13.32
CONT_SJ3-35063AG [mm]
  oval 1.55x2.05 hole 0.85 slot 1.25 at 90 deg: 1(2.4,-0.2)
  oval 2.05x1.55 hole 0.85 slot 1.25 at 0 deg: 2(10.5,1.6) 3(7.4,-3.6) 4(10.5,-1.6) 5(8.5,3.1) 6(10.5,4.5)
  round 1 hole 1.3 unplated: MT(3.5,-3) MT(3.5,3.5)
  silkscreen extent 2,-5 9,5, body extent -3,-4.6 11,4.9, height 5.35
CONT_USB4105-GF-A-120 [mm]
  rrect50% 0.6x0.75 smd: A1/B12(-3.15,2.6) B1/A12(3.15,2.6)
  rrect50% 0.5x0.75 smd: A4/B9(-2.375,2.6) B4/A9(2.375,2.6)
  rrect50% 0.3x0.75 smd: A5(-1.25,2.6) A6(-0.25,2.6) A7(0.25,2.6) A8(1.25,2.6) B5(1.75,2.6) B6(0.75,2.6) B7(-0.75,2.6) B8(-1.75,2.6)
  rrect50% 0.3x0.3 hole 0.65 unplated: MH(-2.89,1.325) MH(2.89,1.325)
  oval 1.3x2.24 / inner oval 1.3x2.24 / far side oval 1.5x2.5 hole 0.7 slot 1.7 at 90 deg: MT1(-4.4,1.803) MT2(4.4,1.803)
  oval 1.3x2.1 / inner oval 1.3x2.1 / far side oval 1.5x2.35 hole 0.7 slot 1.4 at 90 deg: MT3(-4.4,-2.377) MT4(4.4,-2.377)
  silkscreen extent -4.8,-1.46 4.8,3.25, body extent -4.47,-4.92 4.47,2.78, height 3.26
DES_NUMBER [mm]
  round 0.75 smd paste-2539.97 mask+0.05: SP(2.5,-4.8)
  round 0.025 smd paste-2539.97 mask+0.05: SP1(-2.3,2.3) SP2(0,4.6) SP3(2.3,2.3) SP4(2.3,-2.3) SP5(0,-4.6) SP6(-2.3,-2.3) SP7(0,0)
  Top Layer region: 1.888,-0.587 2.075,-0.4 2.178,-0.331 2.3,-0.307 2.422,-0.331 2.525,-0.4 2.525,-0.4 2.712,-0.587 2.87,-0.823 2.925,-1.102 2.925,-1.102 2.925,-3.54 2.877,-3.78 2.741,-3.984 2.741,-3.984 2.525,-4.2 2.422,-4.269 2.3,-4.293 2.178,-4.269 2.075,-4.2 2.075,-4.2 1.859,-3.984 1.723,-3.78 1.675,-3.54 1.675,-3.54 1.675,-1.102 1.73,-0.823 1.888,-0.587
  Top Layer region: -1.888,-0.587 -2.075,-0.4 -2.178,-0.331 -2.3,-0.307 -2.422,-0.331 -2.525,-0.4 -2.525,-0.4 -2.712,-0.587 -2.87,-0.823 -2.925,-1.102 -2.925,-1.102 -2.925,-3.54 -2.877,-3.78 -2.741,-3.984 -2.741,-3.984 -2.525,-4.2 -2.422,-4.269 -2.3,-4.293 -2.178,-4.269 -2.075,-4.2 -2.075,-4.2 -1.859,-3.984 -1.723,-3.78 -1.675,-3.54 -1.675,-3.54 -1.675,-1.102 -1.73,-0.823 -1.888,-0.587
  Top Layer region: 1.713,-0.412 1.9,-0.225 1.969,-0.122 1.993,0 1.969,0.122 1.9,0.225 1.9,0.225 1.713,0.412 1.477,0.57 1.198,0.625 1.198,0.625 -1.24,0.625 -1.48,0.577 -1.684,0.441 -1.684,0.441 -1.9,0.225 -1.969,0.122 -1.993,0 -1.969,-0.122 -1.9,-0.225 -1.9,-0.225 -1.684,-0.441 -1.48,-0.577 -1.24,-0.625 -1.24,-0.625 1.198,-0.625 1.477,-0.57 1.713,-0.412
  Top Layer region: -1.888,0.587 -2.075,0.4 -2.178,0.331 -2.3,0.307 -2.422,0.331 -2.525,0.4 -2.525,0.4 -2.712,0.587 -2.87,0.823 -2.925,1.102 -2.925,1.102 -2.925,3.54 -2.877,3.78 -2.741,3.984 -2.741,3.984 -2.525,4.2 -2.422,4.269 -2.3,4.293 -2.178,4.269 -2.075,4.2 -2.075,4.2 -1.859,3.984 -1.723,3.78 -1.675,3.54 -1.675,3.54 -1.675,1.102 -1.73,0.823 -1.888,0.587
  Top Layer region: 1.888,0.587 2.075,0.4 2.178,0.331 2.3,0.307 2.422,0.331 2.525,0.4 2.525,0.4 2.712,0.587 2.87,0.823 2.925,1.102 2.925,1.102 2.925,3.54 2.877,3.78 2.741,3.984 2.741,3.984 2.525,4.2 2.422,4.269 2.3,4.293 2.178,4.269 2.075,4.2 2.075,4.2 1.859,3.984 1.723,3.78 1.675,3.54 1.675,3.54 1.675,1.102 1.73,0.823 1.888,0.587
  Top Layer region: -1.713,5.012 -1.9,4.825 -1.969,4.722 -1.993,4.6 -1.969,4.478 -1.9,4.375 -1.9,4.375 -1.713,4.188 -1.477,4.03 -1.198,3.975 -1.198,3.975 1.24,3.975 1.48,4.023 1.684,4.159 1.684,4.159 1.9,4.375 1.969,4.478 1.993,4.6 1.969,4.722 1.9,4.825 1.9,4.825 1.684,5.041 1.48,5.177 1.24,5.225 1.24,5.225 -1.198,5.225 -1.477,5.17 -1.713,5.012
  Top Layer region: 1.713,-5.012 1.9,-4.825 1.969,-4.722 1.993,-4.6 1.969,-4.478 1.9,-4.375 1.9,-4.375 1.713,-4.188 1.477,-4.03 1.198,-3.975 1.198,-3.975 -1.24,-3.975 -1.48,-4.023 -1.684,-4.159 -1.684,-4.159 -1.9,-4.375 -1.969,-4.478 -1.993,-4.6 -1.969,-4.722 -1.9,-4.825 -1.9,-4.825 -1.684,-5.041 -1.48,-5.177 -1.24,-5.225 -1.24,-5.225 1.198,-5.225 1.477,-5.17 1.713,-5.012
  silkscreen extent -3.32,-5.6 3.32,5.6
DIOC_0603_LED [mm] "Chip Capacitor, 2-Leads, Body 1,60x0,80mm, IPC Medium Density"
  rrect50% 0.95x1 smd: 1(-0.825,0) 2(0.825,0)
  silkscreen extent 1.52,-0.63 1.52,0.64, body extent -0.8,-0.4 0.8,0.4, height 0.38
DIOC_DFN-1006-2 [mm]
  rrect50% 0.37x0.65 smd paste-2539.97 mask+0.05: 1(-0.355,0) 2(0.355,0)
  silkscreen extent -0.67,-0.45 0.67,0.45, body extent -0.5,-0.3 0.5,0.3, height 0.48
DIOC_DFN-2510A-10 [mm]
  rrect50% 0.2x0.475 smd paste+0: 1(-1,-0.387) 2(-0.5,-0.387) 4(0.5,-0.387) 5(1,-0.387) 6(1,0.387) 7(0.5,0.387) 9(-0.5,0.387) 10(-1,0.387)
  oval 0.2x0.55 smd paste+0: 3(0,-0.387) 8(0,0.387)
  silkscreen extent -1.45,-1 1.45,1, body extent -1.25,-0.5 1.25,0.5, height 0.47
DIOC_DO-214AC [mm]
  rrect50% 2.5x1.75 smd: 1(-2,0) 2(2,0)
  silkscreen extent -2.6,-1.4 3.7,1.4, body extent -2.6,-1.36 2.6,1.36, height 2.7
DIOC_SOD123HP-2 [mm]
  rrect50% 1.15x1.5 smd paste-2539.97: 1(1.6,0)
  round 0.025 smd paste-2539.97: 2(-1.6,0)
  Top Layer region: 0.1,0.9 -1.225,0.9 -1.254,0.894 -1.278,0.878 -1.294,0.854 -1.3,0.825 -1.3,0.825 -1.306,0.796 -1.322,0.772 -1.346,0.756 -1.375,0.75 -1.375,0.75 -1.925,0.75 -2.021,0.731 -2.102,0.677 -2.156,0.596 -2.175,0.5 -2.175,0.5 -2.175,-0.5 -2.156,-0.596 -2.102,-0.677 -2.021,-0.731 -1.925,-0.75 -1.925,-0.75 -1.375,-0.75 -1.346,-0.756 -1.322,-0.772 -1.306,-0.796 -1.3,-0.825 -1.3,-0.825 -1.294,-0.854 -1.278,-0.878 -1.254,-0.894 -1.225,-0.9 -1.225,-0.9 0.1,-0.9 0.205,-0.879 0.294,-0.819 0.354,-0.73 0.375,-0.625 0.375,-0.625 0.375,0.625 0.354,0.73 0.294,0.819 0.205,0.879 0.1,0.9
  silkscreen extent -2.6,-1 -2.4,1, body extent -1.85,-0.89 1.85,0.89, height 0.9
DIOC_SOD323_P [mm]
  oval 1.2x0.75 smd: 1(-1.25,0) 2(1.25,0)
  silkscreen extent -1.5,-0.8 2.1,0.8, body extent -1.34,-0.65 1.34,0.65, height 1.15
DIOC_SOD-123F-2 [mm]
  rrect50% 1.5x1.1 smd: 1(-1.29,0) 2(1.29,0)
  silkscreen extent -1.79,-0.8 2.31,0.8, body extent -1.74,-0.8 1.76,0.8, height 1.1
FERC_0603 [mm] "Chip Resistor, 2-Leads, Body 1,55x0,85mm, IPC Medium Density"
  rrect50% 0.7x0.95 smd: 1(-0.65,0) 2(0.65,0)
  silkscreen extent -1.2,-0.65 1.2,0.65, body extent -0.8,-0.48 0.8,0.48, height 0.55
IC_DHVQFN-14 [mm]
  oval 0.31x0.6 smd mask+0.035: 1(-0.25,1.35)
  rrect50% 0.6x0.31 smd paste-0.02 mask+0.035: 2(-1.1,1) 3(-1.1,0.5) 4(-1.1,0) 5(-1.1,-0.5) 6(-1.1,-1) 9(1.1,-1) 10(1.1,-0.5) 11(1.1,0) 12(1.1,0.5) 13(1.1,1)
  rrect50% 0.31x0.6 smd paste-0.02 mask+0.035: 7(-0.25,-1.35) 8(0.25,-1.35) 14(0.25,1.35)
  rrect50% 1.15x1.65 smd paste-2539.97 mask+0.075: 15(0,0)
  silkscreen extent -1.25,-1.5 1.25,2.12, body extent -1.25,-1.5 1.25,1.5
IC_LFCSP-16#1 [mm]
  oval 0.62x0.3 smd paste-0.02: 1(-1.4,0.75)
  rrect50% 0.62x0.3 smd paste-0.02: 2(-1.4,0.25) 3(-1.4,-0.25) 4(-1.4,-0.75) 9(1.4,-0.75) 10(1.4,-0.25) 11(1.4,0.25) 12(1.4,0.75)
  rrect50% 0.3x0.62 smd paste-0.02: 5(-0.75,-1.4) 6(-0.25,-1.4) 7(0.25,-1.4) 8(0.75,-1.4) 13(0.75,1.4) 14(0.25,1.4) 15(-0.25,1.4) 16(-0.75,1.4)
  round 0.025 smd paste-2539.97: 17(0,0)
  Top Layer region: -0.8,-0.7 -0.8,0.5 -0.785,0.575 -0.743,0.638 -0.743,0.638 -0.637,0.743 -0.575,0.785 -0.501,0.8 -0.501,0.8 0.7,0.8 0.738,0.792 0.771,0.771 0.792,0.738 0.8,0.7 0.8,0.7 0.8,-0.7 0.792,-0.738 0.771,-0.771 0.738,-0.792 0.7,-0.8 0.7,-0.8 -0.7,-0.8 -0.75,-0.787 -0.787,-0.75 -0.8,-0.7
  silkscreen extent -1.86,-1.55 1.55,1.55, body extent -1.55,-1.55 1.55,1.55, height 0.8
IC_LFCSP-16#2 [mm]
  oval 0.62x0.3 smd paste-0.02: 1(-1.4,0.75)
  rrect50% 0.62x0.3 smd paste-0.02: 2(-1.4,0.25) 3(-1.4,-0.25) 4(-1.4,-0.75) 9(1.4,-0.75) 10(1.4,-0.25) 11(1.4,0.25) 12(1.4,0.75)
  rrect50% 0.3x0.62 smd: 5(-0.75,-1.4)
  rrect50% 0.3x0.62 smd paste-0.02: 6(-0.25,-1.4) 7(0.25,-1.4) 8(0.75,-1.4) 13(0.75,1.4) 14(0.25,1.4) 15(-0.25,1.4) 16(-0.75,1.4)
  round 0.025 smd paste-2539.97: 17(0,0)
  Top Layer region: -0.8,-0.7 -0.8,0.5 -0.785,0.575 -0.743,0.638 -0.743,0.638 -0.637,0.743 -0.575,0.785 -0.501,0.8 -0.501,0.8 0.7,0.8 0.738,0.792 0.771,0.771 0.792,0.738 0.8,0.7 0.8,0.7 0.8,-0.7 0.792,-0.738 0.771,-0.771 0.738,-0.792 0.7,-0.8 0.7,-0.8 -0.7,-0.8 -0.75,-0.787 -0.787,-0.75 -0.8,-0.7
  silkscreen extent -1.86,-1.55 1.55,1.55, body extent -1.55,-1.55 1.55,1.55, height 0.8
IC_MPM3683GQN-7 [mm]
  rrect50% 0.75x0.35 smd: 1(-3.425,2.4) 1(-3.425,1.6) 6(-3.425,-1.6) 6(-3.425,-2.4) 14(3.425,-1.6) 14(3.425,-2.4) 19(3.425,2.4) 19(3.425,1.6)
  rrect50% 0.6x1.15 smd: 1(-3,2) 6(-3,-2) 14(3,-2) 19(3,2)
  rrect50% 1.1x0.35 smd paste-0.02: 3(-3.25,0.8) 4(-3.25,0) 5(-3.25,-0.8) 16(3.25,-0.8) 17(3.25,0) 18(3.25,0.8)
  rrect50% 0.35x1.5 smd paste-0.02: 8(-2,-3.05) 9(-1.2,-3.05) 12(1.2,-3.05) 13(2,-3.05) 21(2,3.05) 22(1.2,3.05) 23(0.4,3.05) 24(-0.4,3.05) 25(-1.2,3.05) 26(-2,3.05)
  rrect50% 0.35x1 smd paste-0.02: 10(-0.4,-3.3) 10(0.4,-3.3)
  rrect50% 1.15x1.8 smd paste-2539.97: 10(0,-2.4)
  rrect50% 1.17x1 smd paste-2539.97: 27(-1.6,-0.575) 28(1.6,-0.575)
  silkscreen extent -4.1,-3.5 3.55,3.5, body extent -3.5,-3.53 3.5,3.47, height 3.98
IC_QFN-24_UF_LIT [mm]
  oval 0.72x0.25 smd paste-0.02: 1(-1.952,1.25)
  rrect50% 0.72x0.25 smd paste-0.02: 2(-1.952,0.75) 3(-1.952,0.25) 4(-1.952,-0.25) 5(-1.952,-0.75) 6(-1.952,-1.25) 13(1.952,-1.25) 14(1.952,-0.75) 15(1.952,-0.25) 16(1.952,0.25) 17(1.952,0.75) 18(1.952,1.25)
  rrect50% 0.25x0.72 smd paste-0.02: 7(-1.25,-1.952) 8(-0.75,-1.952) 9(-0.25,-1.952) 10(0.25,-1.952) 11(0.75,-1.952) 12(1.25,-1.952) 19(1.25,1.952) 20(0.75,1.952) 21(0.25,1.952) 22(-0.25,1.952) 23(-0.75,1.952) 24(-1.25,1.952)
  round 0.025 smd paste-1.275: 25(0,0)
  Top Layer region: -1.275,0.849 -1.275,-1.125 -1.264,-1.182 -1.231,-1.231 -1.182,-1.264 -1.125,-1.275 -1.125,-1.275 1.075,-1.275 1.152,-1.26 1.216,-1.216 1.26,-1.152 1.275,-1.075 1.275,-1.075 1.275,1.125 1.264,1.182 1.231,1.231 1.182,1.264 1.125,1.275 1.125,1.275 -0.846,1.275 -0.96,1.252 -1.057,1.187 -1.057,1.187 -1.19,1.055 -1.253,0.96 -1.275,0.849
  silkscreen extent -2.49,-2.18 2.18,2.18, body extent -2,-2 2,2, height 0.8
IC_SOIC14 [mm] "SOIC, 14-Leads, Body 8,65x3,90mm, Pitch 1,27mm, IPC Medium Density"
  oval 1.5x0.6 smd: 1(-2.725,3.81)
  rrect50% 1.5x0.6 smd: 2(-2.725,2.54) 3(-2.725,1.27) 4(-2.725,0) 5(-2.725,-1.27) 6(-2.725,-2.54) 7(-2.725,-3.81) 8(2.725,-3.81) 9(2.725,-2.54) 10(2.725,-1.27) 11(2.725,0) 12(2.725,1.27) 13(2.725,2.54) 14(2.725,3.81)
  silkscreen extent -1.6,-4.4 1.6,4.4, body extent -3,-4.4 3,4.4, height 1.75
IC_SON-10 [mm]
  oval 0.6x0.25 smd: 1(-1.15,1)
  rrect50% 0.6x0.25 smd: 2(-1.15,0.5) 3(-1.15,0) 4(-1.15,-0.5) 5(-1.15,-1) 6(1.15,-1) 7(1.15,-0.5) 8(1.15,0) 9(1.15,0.5) 10(1.15,1)
  round 0.025 smd paste-2539.97: 11(0,0)
  Top Layer region: -0.6,-0.7 -0.6,0.722 -0.586,0.794 -0.545,0.855 -0.545,0.855 -0.47,0.93 -0.392,0.982 -0.3,1 -0.3,1 0.3,1 0.415,0.977 0.512,0.912 0.577,0.815 0.6,0.7 0.6,0.7 0.6,-0.7 0.577,-0.815 0.512,-0.912 0.415,-0.977 0.3,-1 0.3,-1 -0.3,-1 -0.415,-0.977 -0.512,-0.912 -0.577,-0.815 -0.6,-0.7
  silkscreen extent -1.95,-1.42 1.67,1.42, body extent -1.25,-1.25 1.25,1.25, height 0.77
IC_SOT23-6 [mm] "SOT23, 6-Leads, Body 2,90x2,90mm, Pitch 0,95mm, IPC Medium Density"
  oval 1.2x0.51 smd: 1(-1.3,0.95)
  rrect50% 1.2x0.51 smd: 2(-1.3,0) 3(-1.3,-0.95) 4(1.3,-0.95) 5(1.3,0) 6(1.3,0.95)
  silkscreen extent -1.5,-1.5 0.45,1.98, body extent -1.5,-1.51 1.5,1.51, height 1.25
IC_SOT-23-3 [mm] "SOT23, 3-Leads, Body 2,90x2,90mm, Pitch 0,95mm, IPC Medium Density"
  rrect50% 1.2x0.7 smd: 1(-1.15,0.95) 2(-1.15,-0.95) 3(1.15,0)
  silkscreen extent -1.25,-1.5 0.7,1.65, body extent -1.2,-1.45 1.22,1.45, height 1.02
IC_SOT-23-5 [mm] "SOT23, 5-Leads, Body 2,90x2,90mm, Pitch 0,95mm, IPC Medium Density"
  rrect50% 1x0.6 smd: 1(-1.275,0.95) 2(-1.275,0) 3(-1.275,-0.95) 4(1.275,-0.95) 5(1.275,0.95)
  silkscreen extent -1.35,-1.5 0.5,1.65, body extent -1.4,-1.45 1.4,1.45, height 1.15
IC_VQFN56 [mm] "VQFN, 56-Leads, Body 7,00x7,00mm, Pitch 0,40mm, Thermal Pad 5,28x5,28mm, IPC Medium Density"
  oval 0.7x0.2 smd paste-0.02: 1(-3.35,2.6)
  rrect50% 0.7x0.2 smd paste-0.02: 2(-3.35,2.2) 3(-3.35,1.8) 4(-3.35,1.4) 5(-3.35,1) 6(-3.35,0.6) 7(-3.35,0.2) 8(-3.35,-0.2) 9(-3.35,-0.6) 10(-3.35,-1) 11(-3.35,-1.4) 12(-3.35,-1.8) 13(-3.35,-2.2) 14(-3.35,-2.6) 29(3.35,-2.6) 30(3.35,-2.2) 31(3.35,-1.8) 32(3.35,-1.4) 33(3.35,-1) 34(3.35,-0.6) 35(3.35,-0.2) 36(3.35,0.2) 37(3.35,0.6) 38(3.35,1) 39(3.35,1.4) 40(3.35,1.8) 41(3.35,2.2) 42(3.35,2.6)
  rrect50% 0.2x0.7 smd paste-0.02: 15(-2.6,-3.35) 16(-2.2,-3.35) 17(-1.8,-3.35) 18(-1.4,-3.35) 19(-1,-3.35) 20(-0.6,-3.35) 21(-0.2,-3.35) 22(0.2,-3.35) 23(0.6,-3.35) 24(1,-3.35) 25(1.4,-3.35) 26(1.8,-3.35) 27(2.2,-3.35) 28(2.6,-3.35) 43(2.6,3.35) 44(2.2,3.35) 45(1.8,3.35) 46(1.4,3.35) 47(1,3.35) 48(0.6,3.35) 49(0.2,3.35) 50(-0.2,3.35) 51(-0.6,3.35) 52(-1,3.35) 53(-1.4,3.35) 54(-1.8,3.35) 55(-2.2,3.35) 56(-2.6,3.35)
  round 0.025 smd paste-2539.97: 57(0,0)
  Top Layer region: -2.55,1.879 -2.55,-2.35 -2.535,-2.427 -2.491,-2.491 -2.427,-2.535 -2.35,-2.55 -2.35,-2.55 2.35,-2.55 2.427,-2.535 2.491,-2.491 2.535,-2.427 2.55,-2.35 2.55,-2.35 2.55,2.35 2.535,2.427 2.491,2.491 2.427,2.535 2.35,2.55 2.35,2.55 -1.879,2.55 -2.037,2.519 -2.171,2.429 -2.171,2.429 -2.429,2.171 -2.519,2.037 -2.55,1.879
  silkscreen extent -3.91,-3.58 3.58,3.57, body extent -3.57,-3.57 3.57,3.57, height 1
IC_WSON-10 [mm]
  oval 0.5x0.22 smd mask+0.035: 1(-0.95,0.8)
  rrect50% 0.5x0.22 smd mask+0.035: 2(-0.95,0.4) 3(-0.95,0) 4(-0.95,-0.4) 5(-0.95,-0.8) 6(0.95,-0.8) 7(0.95,-0.4) 8(0.95,0) 9(0.95,0.4) 10(0.95,0.8)
  round 0.025 smd paste-2539.97 mask+0.05: 11(0,0)
  Top Layer region: -0.45,-0.525 -0.45,0.479 -0.437,0.545 -0.4,0.6 -0.4,0.6 -0.306,0.694 -0.244,0.735 -0.171,0.75 -0.171,0.75 0.225,0.75 0.311,0.733 0.384,0.684 0.433,0.611 0.45,0.525 0.45,0.525 0.45,-0.525 0.433,-0.611 0.384,-0.684 0.311,-0.733 0.225,-0.75 0.225,-0.75 -0.225,-0.75 -0.311,-0.733 -0.384,-0.684 -0.433,-0.611 -0.45,-0.525
  silkscreen extent -1.42,-1.1 1.4,1.1, body extent -1.05,-1 1.05,1, height 0.8
IND_1008 [mm]
  rrect50% 0.8x2 smd: 1(-1,0) 2(1,0)
  silkscreen extent -1.3,-1.2 1.3,1.2, body extent -1.25,-1 1.25,1, height 1.2
IND_2020_S [mm]
  round 0.025 smd: 1(0,2.185) 2(0,-2.185)
  rrect50% 1.25x2.29 smd: 3(3,0) 4(-3,0)
  Top Layer region: -1.525,3.075 -1.525,1.525 -1.488,1.339 -1.383,1.182 -1.226,1.077 -1.04,1.04 -1.04,1.04 1.04,1.04 1.226,1.077 1.383,1.182 1.488,1.339 1.525,1.525 1.525,1.525 1.525,3.075 1.506,3.173 1.45,3.255 1.368,3.311 1.27,3.33 1.27,3.33 -1.27,3.33 -1.368,3.311 -1.45,3.255 -1.506,3.173 -1.525,3.075
  Top Layer region: 1.525,-3.075 1.525,-1.525 1.488,-1.339 1.383,-1.182 1.226,-1.077 1.04,-1.04 1.04,-1.04 -1.04,-1.04 -1.226,-1.077 -1.383,-1.182 -1.488,-1.339 -1.525,-1.525 -1.525,-1.525 -1.525,-3.075 -1.506,-3.173 -1.45,-3.255 -1.368,-3.311 -1.27,-3.33 -1.27,-3.33 1.27,-3.33 1.368,-3.311 1.45,-3.255 1.506,-3.173 1.525,-3.075
  silkscreen extent -3.2,-3.2 3.2,3.2, body extent -3,-3 3,3, height 3.25
MT_M3 [mm]
  round 5.6 hole 3.2: 1(0,0)
RESC_0402 [mm] "Chip Resistor, 2-Leads, Body 1,00x0,50mm, IPC Medium Density"
  rrect50% 0.55x0.55 smd: 1(-0.45,0) 2(0.45,0)
  silkscreen extent -0.9,-0.45 0.9,0.45, body extent -0.53,-0.28 0.53,0.28, height 0.37
RESC_0603 [mm] "Chip Resistor, 2-Leads, Body 1,55x0,85mm, IPC Medium Density"
  rrect50% 0.7x0.95 smd: 1(-0.65,0) 2(0.65,0)
  silkscreen extent -1.2,-0.65 1.2,0.65, body extent -0.8,-0.48 0.8,0.48, height 0.55
RESC_0805 [mm] "Chip Resistor, 2-Leads, Body 2,00x1,25mm, IPC Medium Density"
  rrect50% 1x1.4 smd: 1(-0.95,0) 2(0.95,0)
  silkscreen extent -1.65,-0.9 1.65,0.9, body extent -1.05,-0.7 1.05,0.7, height 0.55
SWS_EVQP7A [mm]
  rrect50% 1.4x1.05 smd: 1(-1.8,0.725) 2(1.8,0.725) 3(-1.8,-0.725) 4(1.8,-0.725)
  silkscreen extent -1,-2.1 1,1.3, body extent -2.35,-2.1 2.35,1.45, height 1.35
TP_1.4mm#1 [mm]
  round 1.4 smd paste-2539.97 mask+0.025: 1(25.6,37.6)
TP_1.4mm#2 [mm]
  round 1.25 smd paste-2539.97 mask+0: 1(0,0)
TP_1.4mm#3 [mm]
  round 1.4 smd paste-2539.97 mask+0.025: 1(21.9,48.6)
TP_1.4mm#4 [mm]
  round 1.25 smd paste-2539.97 mask+0: 1(55.6,75.4)
TP_1.4mm#5 [mm]
  round 1.25 smd paste-2539.97 mask+0: 1(42.7,68)
TP_1mm [mm]
  round 1 smd paste-2539.97 mask+0.025: 1(0,0)

## Part data
C1_U_MIC_connection1 C1_U_MIC_connection2 C1_U_MIC_connection3 C1_U_MIC_connection4 C2_U_MIC_connection1 C2_U_MIC_connection2 C2_U_MIC_connection3 C2_U_MIC_connection4 C4_U_double_preamp1 C4_U_double_preamp2 C5_U_double_preamp1 C5_U_double_preamp2 C13_U_double_preamp1 C13_U_double_preamp2 C14_U_double_preamp1 C14_U_double_preamp2 C16_U_double_single_to_diff_conv1 C16_U_double_single_to_diff_conv2 C19_U_double_single_to_diff_conv1 C19_U_double_single_to_diff_conv2 C44_U_band_pass_diff_filter1 C44_U_band_pass_diff_filter2 C44_U_band_pass_diff_filter3 C44_U_band_pass_diff_filter4 C45_U_band_pass_diff_filter1 C45_U_band_pass_diff_filter2 C45_U_band_pass_diff_filter3 C45_U_band_pass_diff_filter4 C89: "Multilayer Ceramic Capacitors MLCC - SMD/SMT 16V 1uF X7R 0603 5% HI CV", Dielectric=X7R, Manufacturer=YAGEO, Package=0603, Supplier Part Number 1=603-CC0603JRX77BB105, Tolerance=5%, Voltage=16V, Supplier 1=Mouser
C3_U_MIC_connection1 C3_U_MIC_connection2 C3_U_MIC_connection3 C3_U_MIC_connection4 C46_U_MIC_connection1 C46_U_MIC_connection2 C46_U_MIC_connection3 C46_U_MIC_connection4: "Multilayer Ceramic Capacitors MLCC - SMD/SMT 50V 100pF C0G 0402 1 %", Dielectric=C0G, Manufacturer="KYOCERA AVX", Package=0402, Supplier Part Number 1=581-04025A101F, Tolerance=1%, Voltage=50V, Supplier 1=Mouser
C6_U_double_preamp1 C6_U_double_preamp2 C9_U_double_preamp1 C9_U_double_preamp2 C12_U_double_preamp1 C12_U_double_preamp2 C15_U_double_preamp1 C15_U_double_preamp2 C50 C62 C64 C76 C77 C78 C79 C80 C91: "Multilayer Ceramic Capacitors MLCC - SMD/SMT 16V 10uF X5R 0805 10 %", Dielectric=X5R, Manufacturer="TAIYO YUDEN", Package=0805, Supplier Part Number 1=963-EMK212BJ106KG-T, Tolerance=10%, Voltage=16V, Supplier 1=Mouser